# Altium PCB Node_nhan.PcbDoc
Units mm, origin at the board's own origin, x right, y up, seen from the top; angles counter-clockwise.
Board outline 80 x 75 mm, 2 copper layers (Top Layer, Bottom Layer); 13 components, 10 nets, 62 pads, 0 vias.
Unrouted connection lines stored in the file: 6.
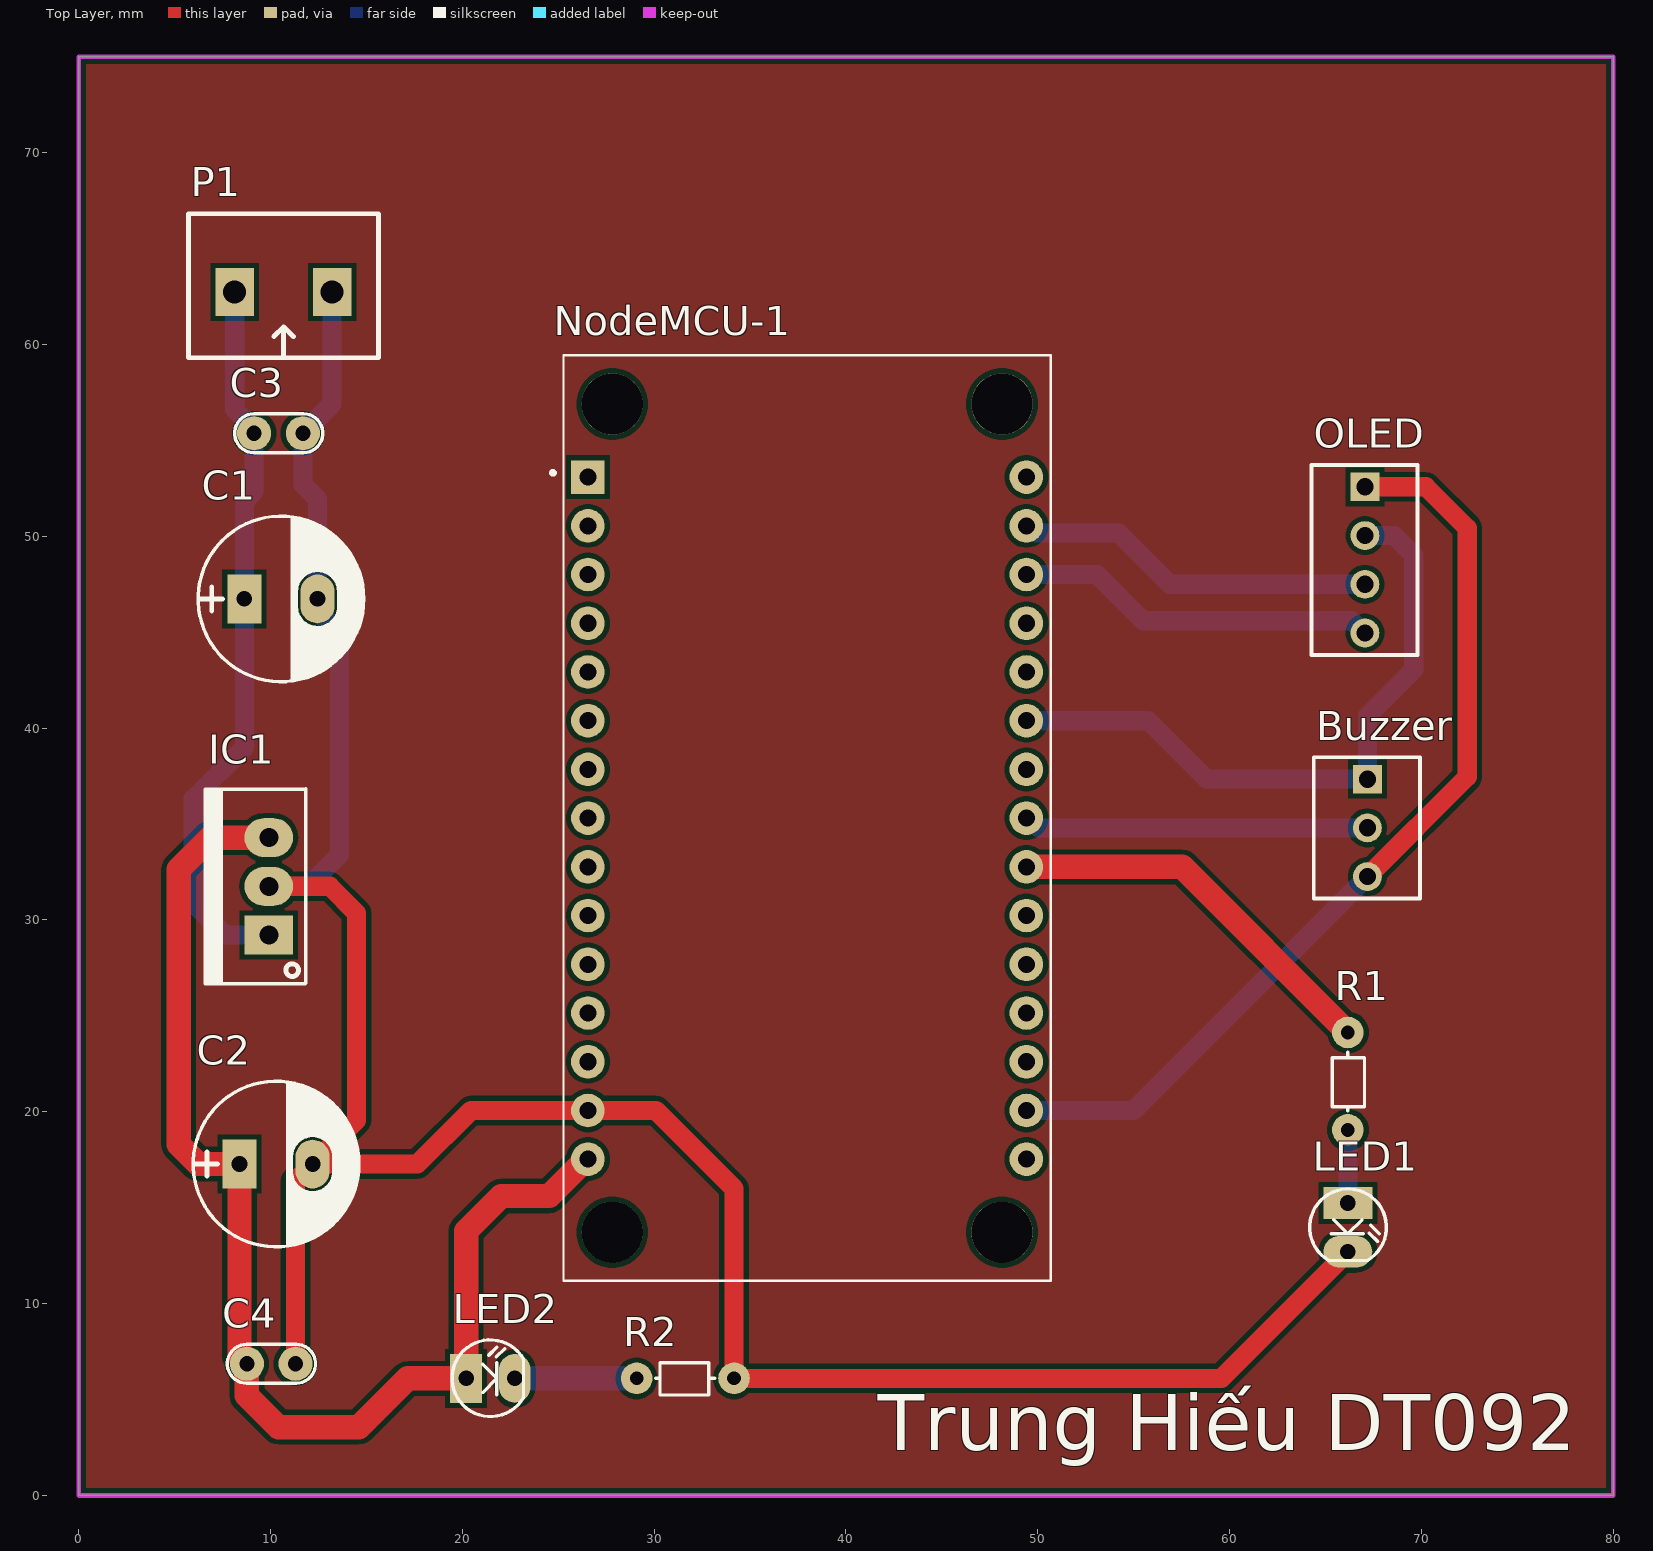
[diagram p0: Top Layer view]
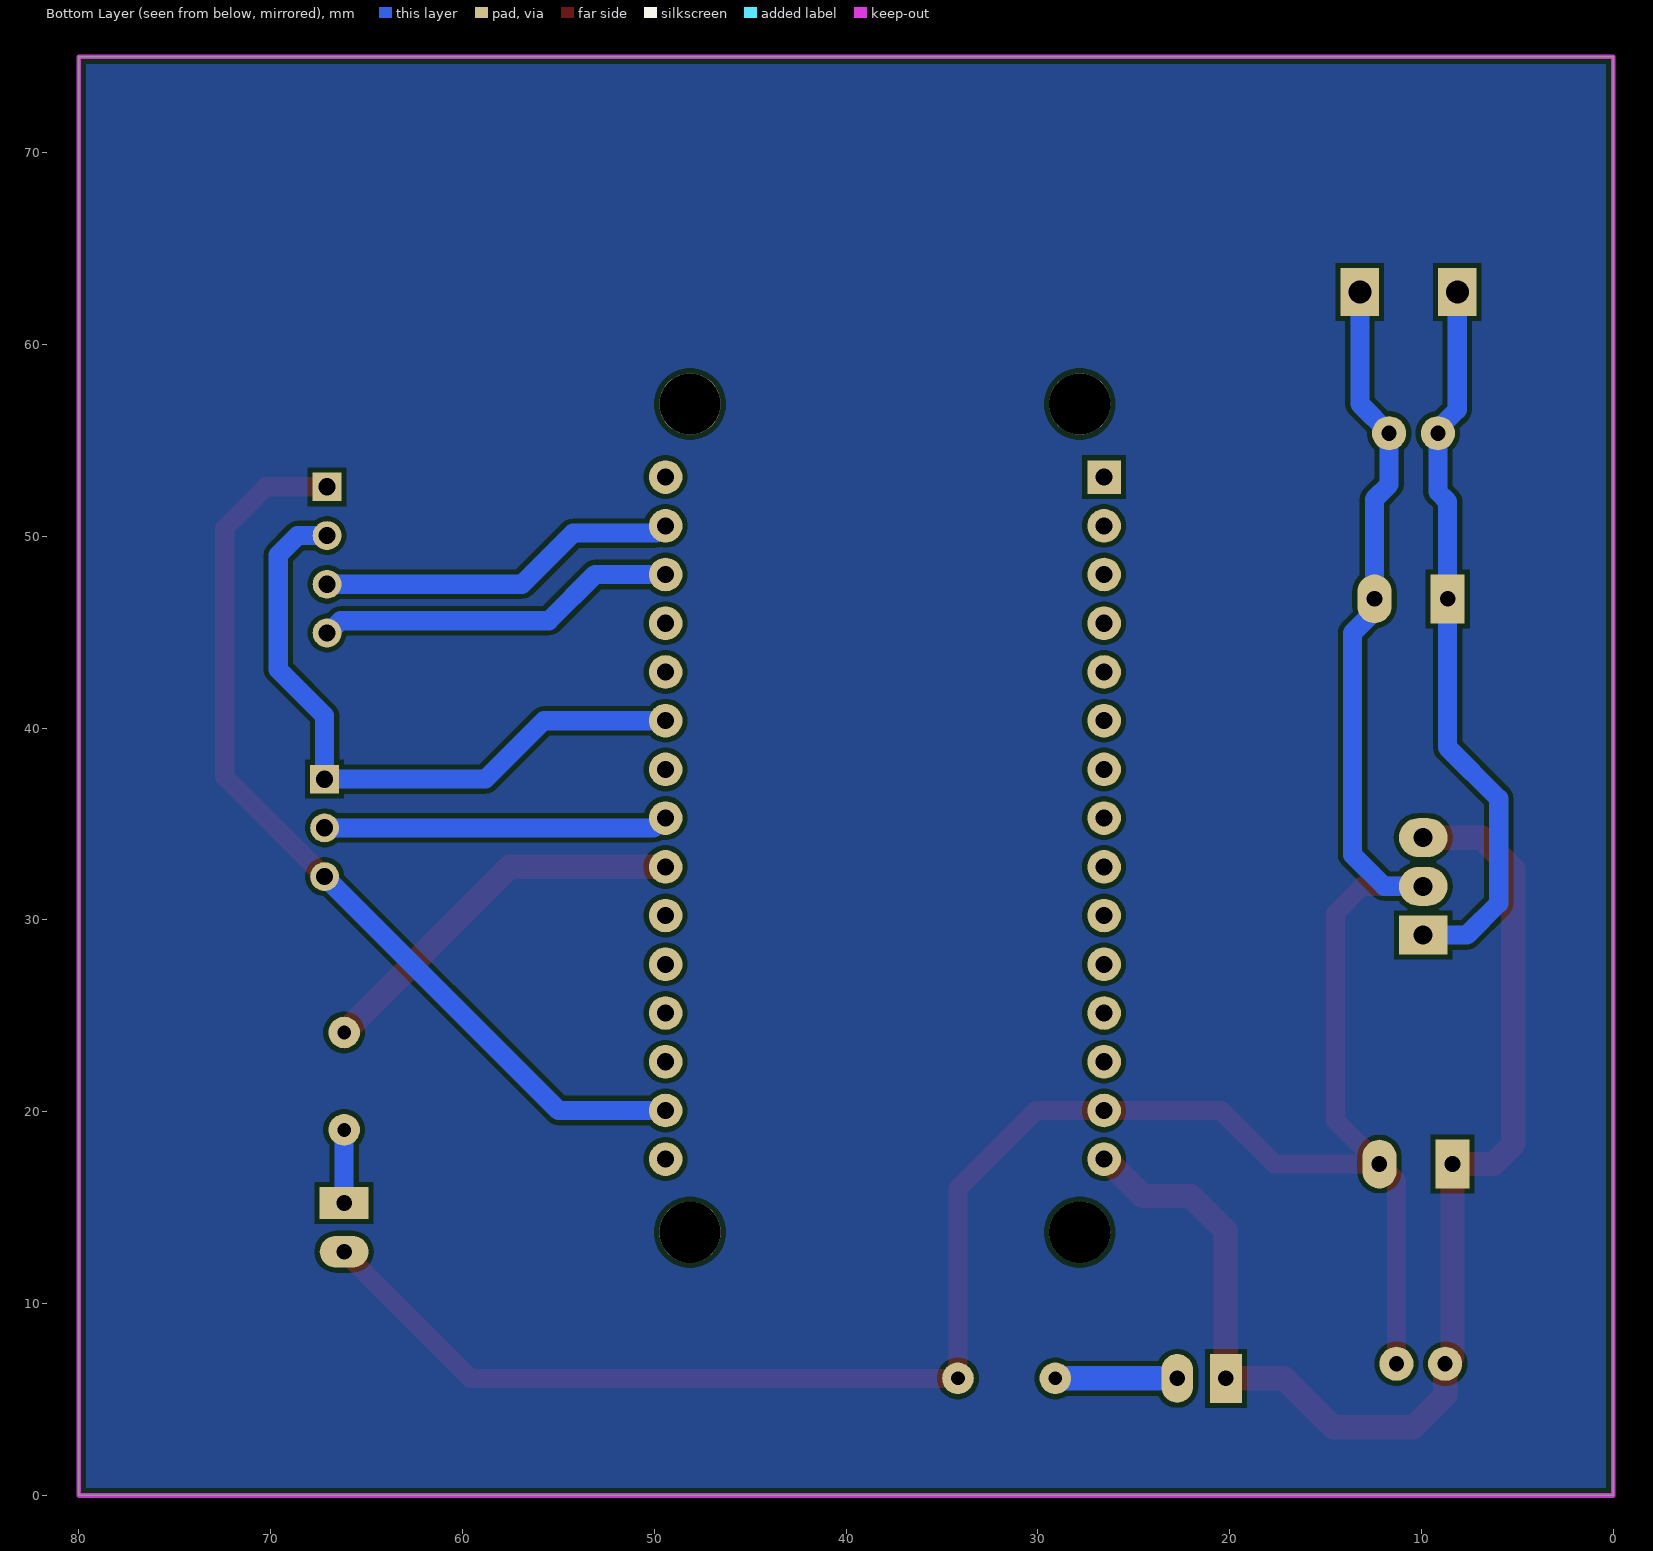
[diagram p1: Bottom Layer view, seen from below]
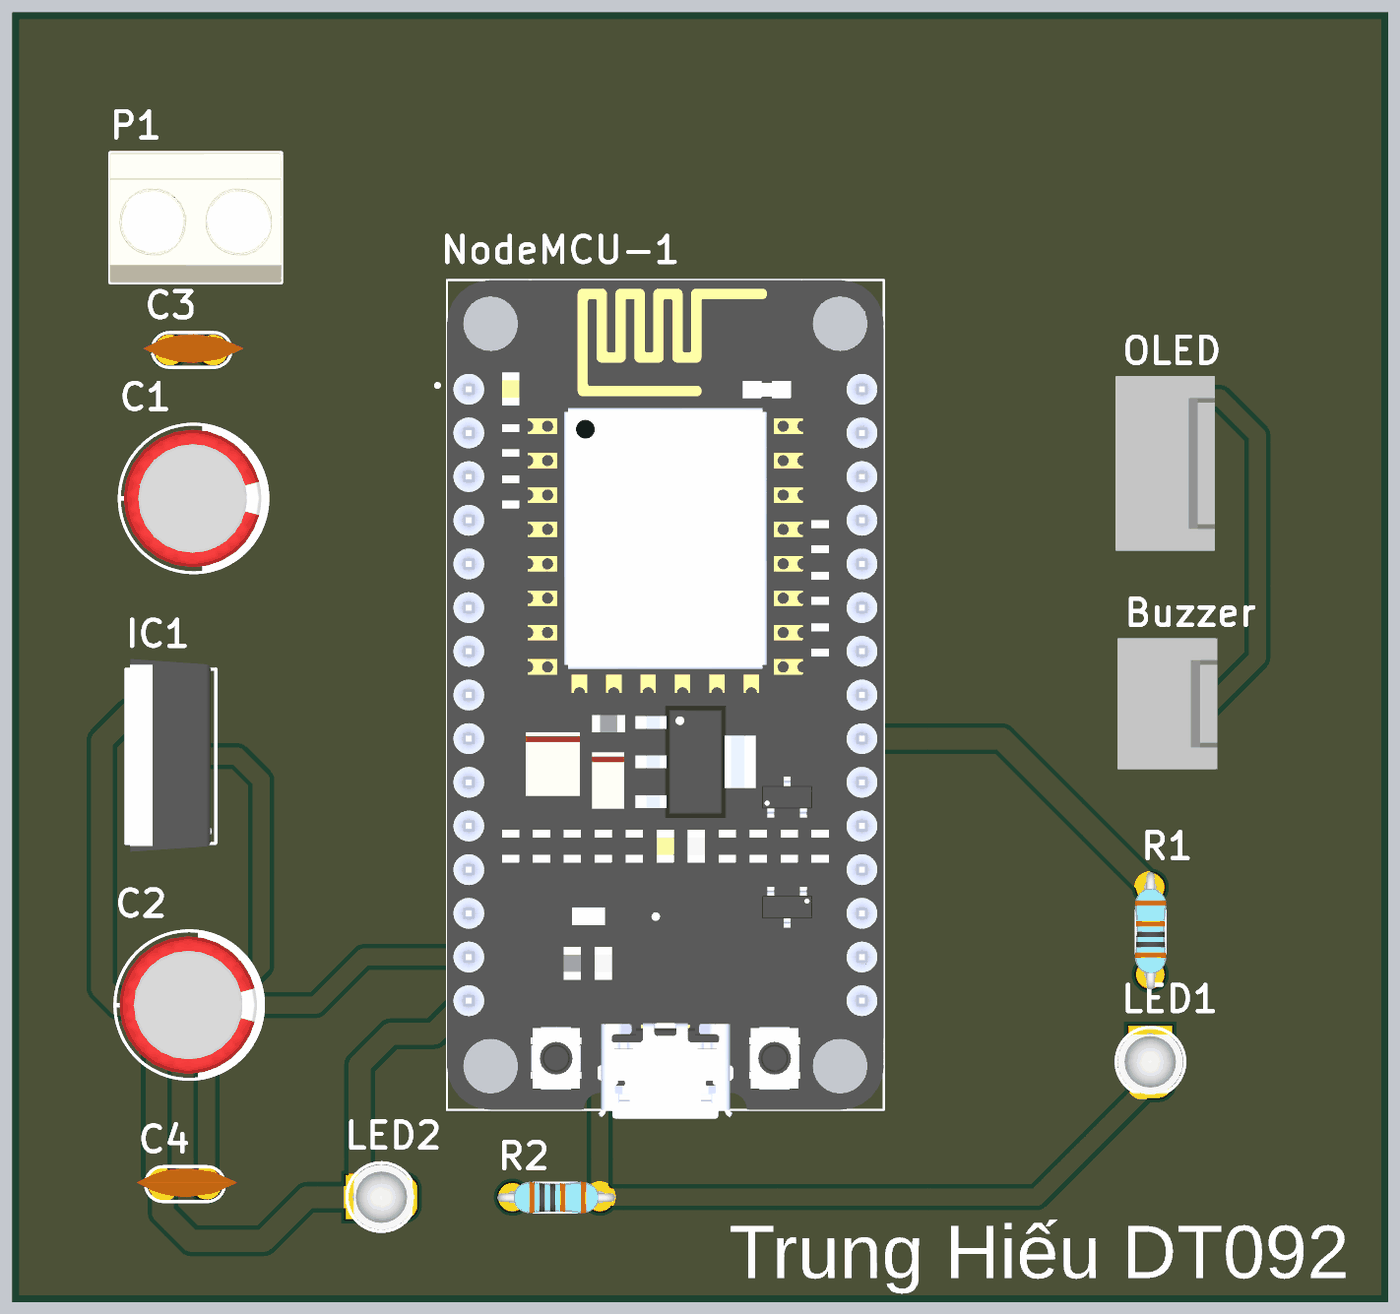
[diagram p2: 3D render of the assembled board from above, using the file's embedded part models]

## Layer stack, top to bottom
Top Solder: solder mask 0.0102, Solder Resist, Dk 3.5
Top Layer: signal copper 0.0356
Dielectric1: dielectric 0.32, FR-4, Dk 4.8
Bottom Layer: signal copper 0.0356
Bottom Solder: solder mask 0.0102, Solder Resist, Dk 3.5

## Board outline
0,0 0,75 80,75 80,0

## Design rules (kind name [scope] priority, off if disabled: settings)
Clearance [All] p1: gap=0.254 ignorepadtopadclearanceinfootprint=FALSE
PolygonConnect [All] p1: connectstyle=Relief reliefconductorwidth=0.254 reliefentries=4 polygonreliefangle="90 Angle" airgapwidth=0.254
RoutingVias [All] p1: holewidth=0.711 width=1.27 viastyle="Through Hole" minholewidth=0.711 minwidth=1.27 maxholewidth=0.711 maxwidth=1.27
SolderMaskExpansion [All] p1: expansion=0.102 istentingtop=FALSE
SupplyNets "Schematic Supply Nets_2" [InNet('+5')] p1: voltage=0.000
SupplyNets "Schematic Supply Nets_1" [InNet('GND')] p2: voltage=0.000
SupplyNets "Schematic Supply Nets" [InNet('+12')] p3: voltage=0.000
Width [All] p1: maxlimit=2.54 minlimit=0.254 preferedwidth=1.016
30 further rules are at their usual default settings.

## Components (designator, comment, footprint, x,y, rotation, side; value= is the part's Value field where it differs from the comment)
Buzzer "Header3" HDR3 67.183,37.338 r270 top
C1 "100uF/25V" CP1.5/3.4 8.636,46.736 r0 top value=100uF/35V/50V
C2 "47uF/12V" CP1.5/3.4 8.382,17.272 r0 top value=100uF/35V/50V
C3 "104" CN1 9.144,55.372 r0 top value=100pF
C4 "104" CN1 8.763,6.858 r0 top value=100pF
IC1 "LM7805" QTO-220 9.906,29.21 r90 top
LED1 "LED" LED-3 66.167,15.24 r270 top value="LED 3 ly Single Colour"
LED2 "LED" LED-3 20.193,6.096 r0 top value="LED 3 ly Single Colour"
NodeMCU-1 "NodeMCU V1.0 ESP-12E" MODULE_ZC563900 37.973,35.306 r0 top
OLED "Header4" HDR4 67.056,52.578 r270 top
P1 "Header 2 - M" "Medium - Header 2" 10.668,62.738 r180 top
R1 "220" R1/8W 66.167,21.59 r270 top value="R1/4W - 1K"
R2 "220" R1/8W 31.623,6.096 r180 top value="R1/4W - 1K"

## Footprints (in the part's own frame and the unit in brackets; to place one, negate y for a bottom-side part, rotate by r counter-clockwise, add the part's x,y. Pads: shape width x height; smd on the part's side, far side on the other; paste and mask are expansions set on the pad)
CN1 [mil]
  round 70 hole 31: 1(0,0) 2(100,0)
  silkscreen extent -40,-40 141,40, body extent -60,-30 170,37, height 265
CP1.5/3.4 [mil] "Tu hoa 220->470uF,16V, 470uF/16V,25V"
  rect 70x100 hole 32: 1(0,0)
  oval 70x100 hole 32: 2(150,0)
  silkscreen extent -95,-170 245,170, body extent -85,-157 230,157, height 446
HDR3 [mm] "Connector; Header; 3 Position"
  rect 1.5x1.5 hole 0.9: 1(0,0)
  round 1.5 hole 0.9: 2(2.54,0) 3(5.08,0)
  silkscreen extent -1.14,-2.79 6.22,2.74, body extent -1.27,-2.92 6.35,2.88, height 11.72
HDR4 [mm] "Connector; Header; 4 Position"
  rect 1.5x1.5 hole 0.9: 1(0,0)
  round 1.5 hole 0.9: 2(2.54,0) 3(5.08,0) 4(7.62,0)
  silkscreen extent -1.14,-2.79 8.76,2.74, body extent -1.27,-2.92 8.89,2.88, height 11.72
LED-3 [mil] "LED 2 PIN, 3ly Only colour"
  rect 65x100 hole 32: 1(0,0)
  oval 65x100 hole 32: 2(100,0)
  silkscreen extent -29,-78 118,79, body extent -13,-75 125,75, height 217
"Medium - Header 2" [mm]
  rect 2x2.5 hole 1.2: 1(-2.54,0) 2(2.54,0)
  silkscreen extent -4.95,-4.08 4.95,3.43, body extent -5,-4.07 5,3.43, height 10
MODULE_ZC563900 [mil]
  round 69 hole 35: 3V3(-450,-300) 3V3(450,-700) 3V3(450,200) CLK(-450,-100) D0(450,700) D1(450,600) D2(450,500) D3(450,400) D4(450,300) D5(450,0) D6(450,-100) D7(450,-200) D8(450,-300) EN(-450,-400) GND(-450,-600) GND(-450,-200) GND(-450,600) GND(450,-600) GND(450,100) RST(-450,-500) RX(450,-400) SC(-450,100) SD0(-450,0) SD1(-450,200) SD2(-450,300) SD3(-450,400) TX(450,-500) VIN(-450,-700) VV(-450,500)
  rect 69x69 / inner round 69 / far side rect 69x69 hole 35: A0(-450,700)
  round 125.98 hole 125.98 unplated: ""(-400,-850) ""(-400,850) ""(400,-850) ""(400,850)
  silkscreen extent -526,-950 500,950, body extent -500,-970 500,950, height 276
QTO-220 [mil] "TO-220 - 1-2-3"
  rect 80x100 hole 39: 1(0,0)
  oval 80x100 hole 39: 2(100,0) 3(200,0)
  silkscreen extent -100,-76 300,130, body extent -119,-64 322,121, height 755
R1/8W [mil] "R 1/8W, 2 pin, 300mil"
  round 65 hole 28: 1(-100,0) 2(100,0)
  silkscreen extent -60,-32 61,34, body extent -135,-35 135,37, height 86

## Part data
Buzzer: "Header IDC, 3 x 1 Pin Vertical 2.54mm Pitch (Non-Boxed, Male)", Manufacturer="W¨¹rth Elektronik eiSos GmbH", partNo=613002143121, ComponentLink1 Description=Manufacturer, ComponentLink1URL=http://www.we-online.com, ComponentLink2 Description=Datasheet, ComponentLink2URL=http://katalog.we-online.de/em/datasheet/6130xx143121.pdf, Created by="Karrer Zheng", Created Date="29 March 2013", NoPins=02
C1 C2: library part CP3, "Cap 100uF/35V - 470uF/16V", Description 1="1000uF/6,3V - 470uF/16V - 330uF - 25V", Description 2="220uF/35V - 100uF/50V - 63V - 4,7uF/200V", Description 3="22uF => 33uF100V - 3,3uF => 4,7uF/250V", Description 4="2,2uF =>3,3uF/350 - 2,2uF/400V - 1uF/450V"
C3 C4: library part CN1, "Cap np  1pF - 472pF"
IC1: library part LM78xx, "On ap +, from + 5 to + 24VDC"
LED1 LED2: "LED Single colour Green and Red"
NodeMCU-1: "NodeMCU V1.0 ESP8266 (ESP-12E)"
OLED: "Header IDC, 4 x 1 Pin Vertical 2.54mm Pitch (Non-Boxed, Male)", Manufacturer="W¨¹rth Elektronik eiSos GmbH", partNo=613002143121, ComponentLink1 Description=Manufacturer, ComponentLink1URL=http://www.we-online.com, ComponentLink2 Description=Datasheet, ComponentLink2URL=http://katalog.we-online.de/em/datasheet/6130xx143121.pdf, Created by="Karrer Zheng", Created Date="29 March 2013", NoPins=02
P1: "Header, 2-Pin, Medium", LatestRevisionDate=17-Jul-2002, LatestRevisionNote="Re-released for DXP Platform.", Publisher="Altium Limited"
R1 R2: library part R, "Resistor 1/4W"

## Nets (pads, with @x,y where several pads share a name; then routed paths per layer and width w, separated by ;. In a path a pad name is that pad's centre, name@x,y a point inside that pad or via, vN(x,y) a via of type N, cw(c..) or ccw(c..) an arc to the next point about the centre after c; other vN are vias at no path point)
+3.3: Buzzer.1 NodeMCU-1.3V3 OLED.2 | length 34.7
  Bottom Layer w1: NodeMCU-1.3V3@49.403,40.386 55.753,40.386 58.801,37.338 Buzzer.1 67.183,40.64 69.596,43.053 69.596,49.022 68.58,50.038 OLED.2
+5: C2.1 C4.1 IC1.3 LED2.1 NodeMCU-1.VIN | length 64.3
  Top Layer w1.27: IC1.3 6.858,34.29 5.207,32.639 5.207,18.288 6.223,17.272 C2.1 8.382,7.239 C4.1 8.763,5.207 10.414,3.556 14.605,3.556 17.145,6.096 LED2.1 20.193,13.784 22.018,15.609 24.527,15.609 26.444,17.526 NodeMCU-1.VIN
+12: C1.1 C3.1 IC1.1 P1.2 | length 38.2
  Bottom Layer w1: P1.2 8.128,56.599 9.144,55.583 C3.1 9.144,52.324 8.636,51.816 C1.1 8.636,38.989 5.969,36.322 5.969,30.861 7.62,29.21 IC1.1
Buzzer: Buzzer.2 NodeMCU-1.D5 | length 18
  Bottom Layer w1: NodeMCU-1.D5 49.534,35.306 50.042,34.798 Buzzer.2
GND: Buzzer.3 C1.2 C2.2 C3.2 C4.2 IC1.2 LED1.2 NodeMCU-1.GND OLED.1 P1.1 R2.1 | length 183.9
  Top Layer w1: IC1.2 13.081,31.75 14.478,30.353 14.478,19.558 C2.2 ; C4.2 11.303,16.383 C2.2 ; LED1.2 59.563,6.096 R2.1 34.163,16.002 30.099,20.066 26.543,20.066 25.273,20.066 20.447,20.066 17.653,17.272 C2.2 ; OLED.1 70.231,52.578 72.39,50.419 72.39,37.465 Buzzer.3
  Bottom Layer w1: IC1.2 11.938,31.75 13.589,33.401 13.589,44.958 12.446,46.101 C1.2 12.446,51.943 11.684,52.705 C3.2 13.208,56.896 P1.1 ; NodeMCU-1.GND@49.403,20.066 54.991,20.066 Buzzer.3
LED: NodeMCU-1.D6 R1.1 | length 20.3
  Top Layer w1.27: NodeMCU-1.D6 57.531,32.766 R1.1
NetLED1_1: LED1.1 R1.2 | length 3.8
  Bottom Layer w1: LED1.1 R1.2
NetLED2_2: LED2.2 R2.2 | length 6.3
  Bottom Layer w1.27: LED2.2 R2.2
SCL: NodeMCU-1.D1 OLED.3 | length 18.9
  Bottom Layer w1: NodeMCU-1.D1 49.534,50.546 49.915,50.165 54.229,50.165 56.896,47.498 OLED.3
SDA: NodeMCU-1.D2 OLED.4 | length 18.9
  Bottom Layer w1: NodeMCU-1.D2 53.086,48.006 55.499,45.593 66.359,45.593 66.994,44.958 OLED.4
pads on no net: NodeMCU-1. NodeMCU-1.A0 NodeMCU-1.CLK NodeMCU-1.D0 NodeMCU-1.D3 NodeMCU-1.D4 NodeMCU-1.D7 NodeMCU-1.D8 NodeMCU-1.EN NodeMCU-1.RST NodeMCU-1.RX NodeMCU-1.SC NodeMCU-1.SD0 NodeMCU-1.SD1 NodeMCU-1.SD2 NodeMCU-1.SD3 NodeMCU-1.TX NodeMCU-1.VV

## Polygon pours and split planes (outlines as drawn)
no net on Top Layer (solid, pour order 0): 0,0 80,0 80,75 0,75
no net on Bottom Layer (solid, pour order 1): 0,0 80,0 80,75 0,75

## Keep-outs
Keep-Out Layer:
  the board outline again, w0.254

## Silkscreen, mask and mechanical layers (free items; w line width, h text height)
Top Overlay:
  text "Trung Hiếu DT092" at 41.656,1.397 h5